# Altium PCB PCBPanier.PcbDoc
Units mm, origin at the board's own origin, x right, y up, seen from the top; angles counter-clockwise.
Board outline 80 x 100 mm, 2 copper layers (Top Layer, Bottom Layer); 52 components, 47 nets, 180 pads, 0 vias.
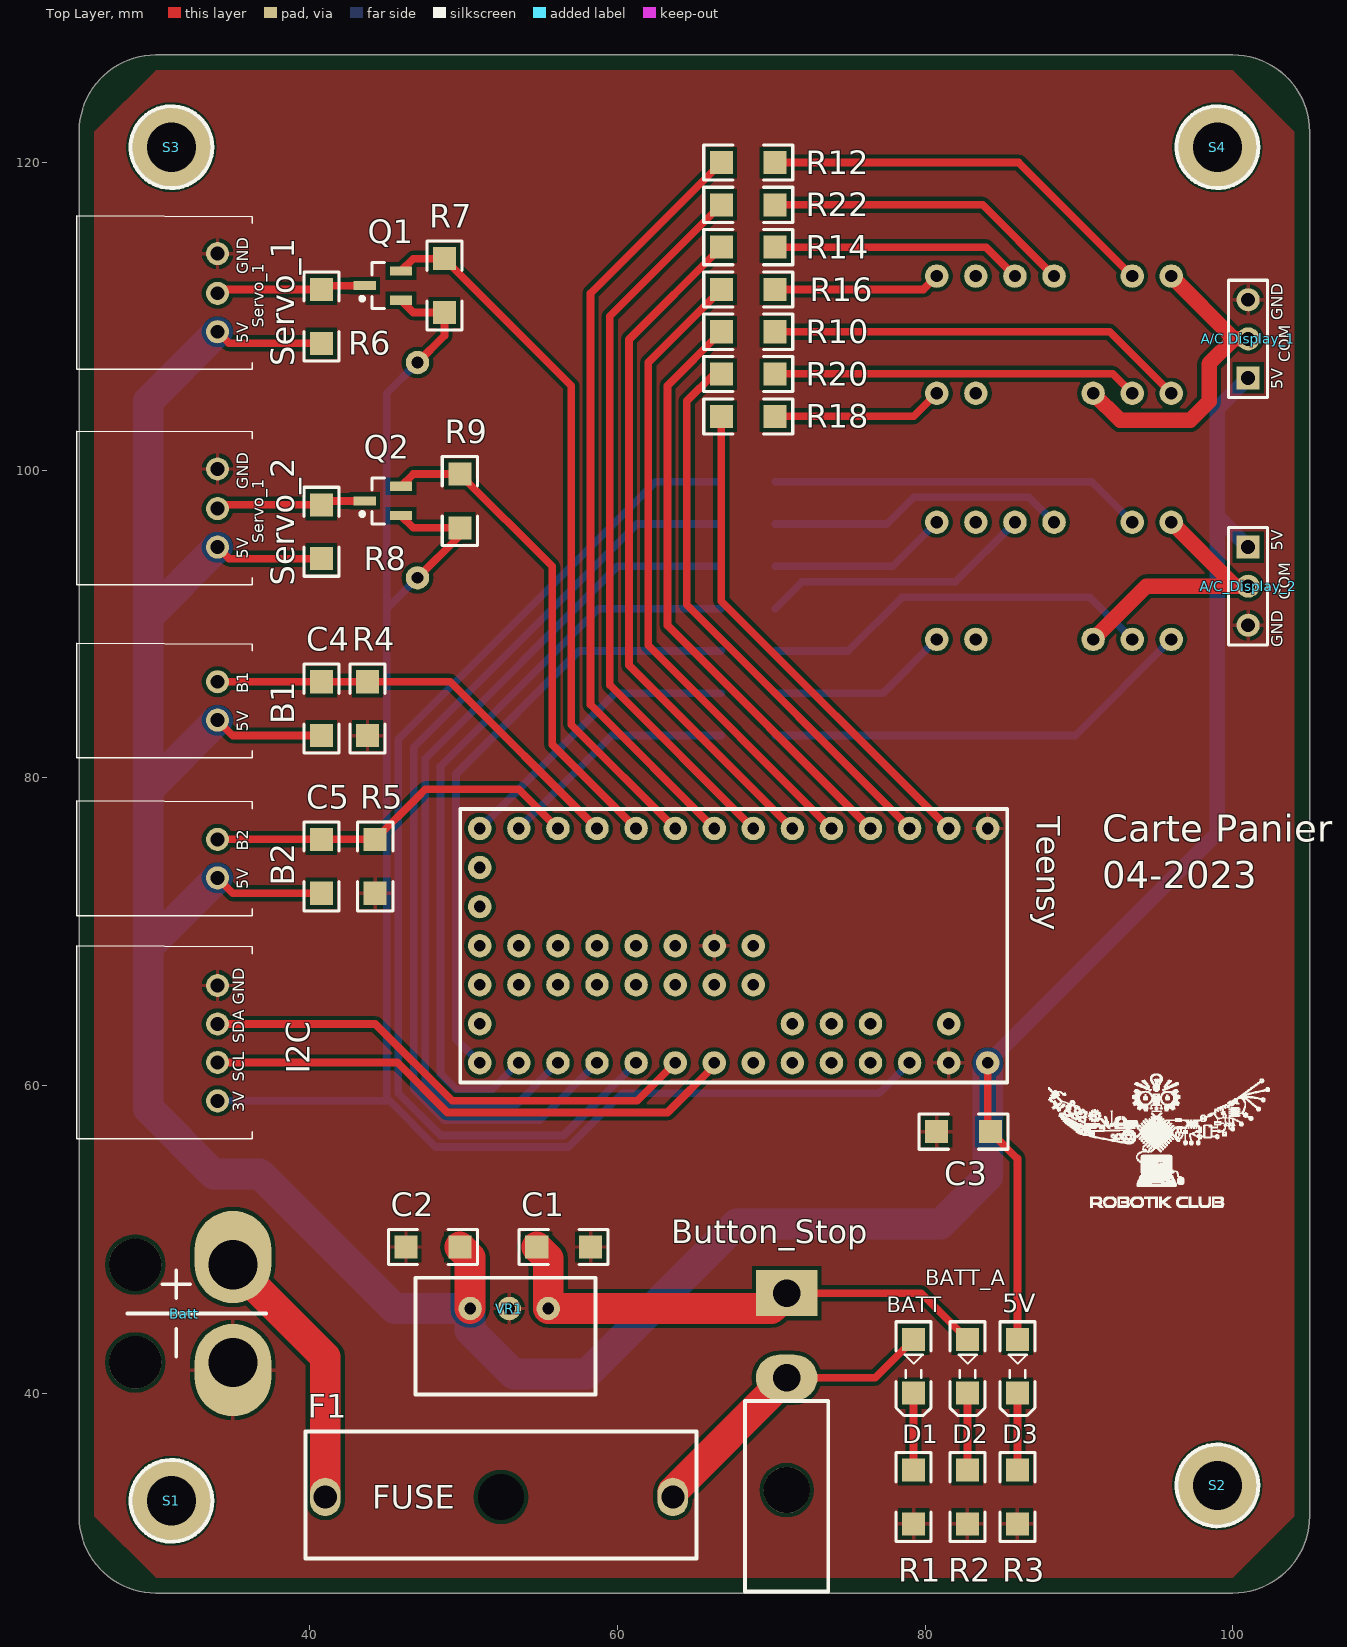
[diagram p0: Top Layer view]
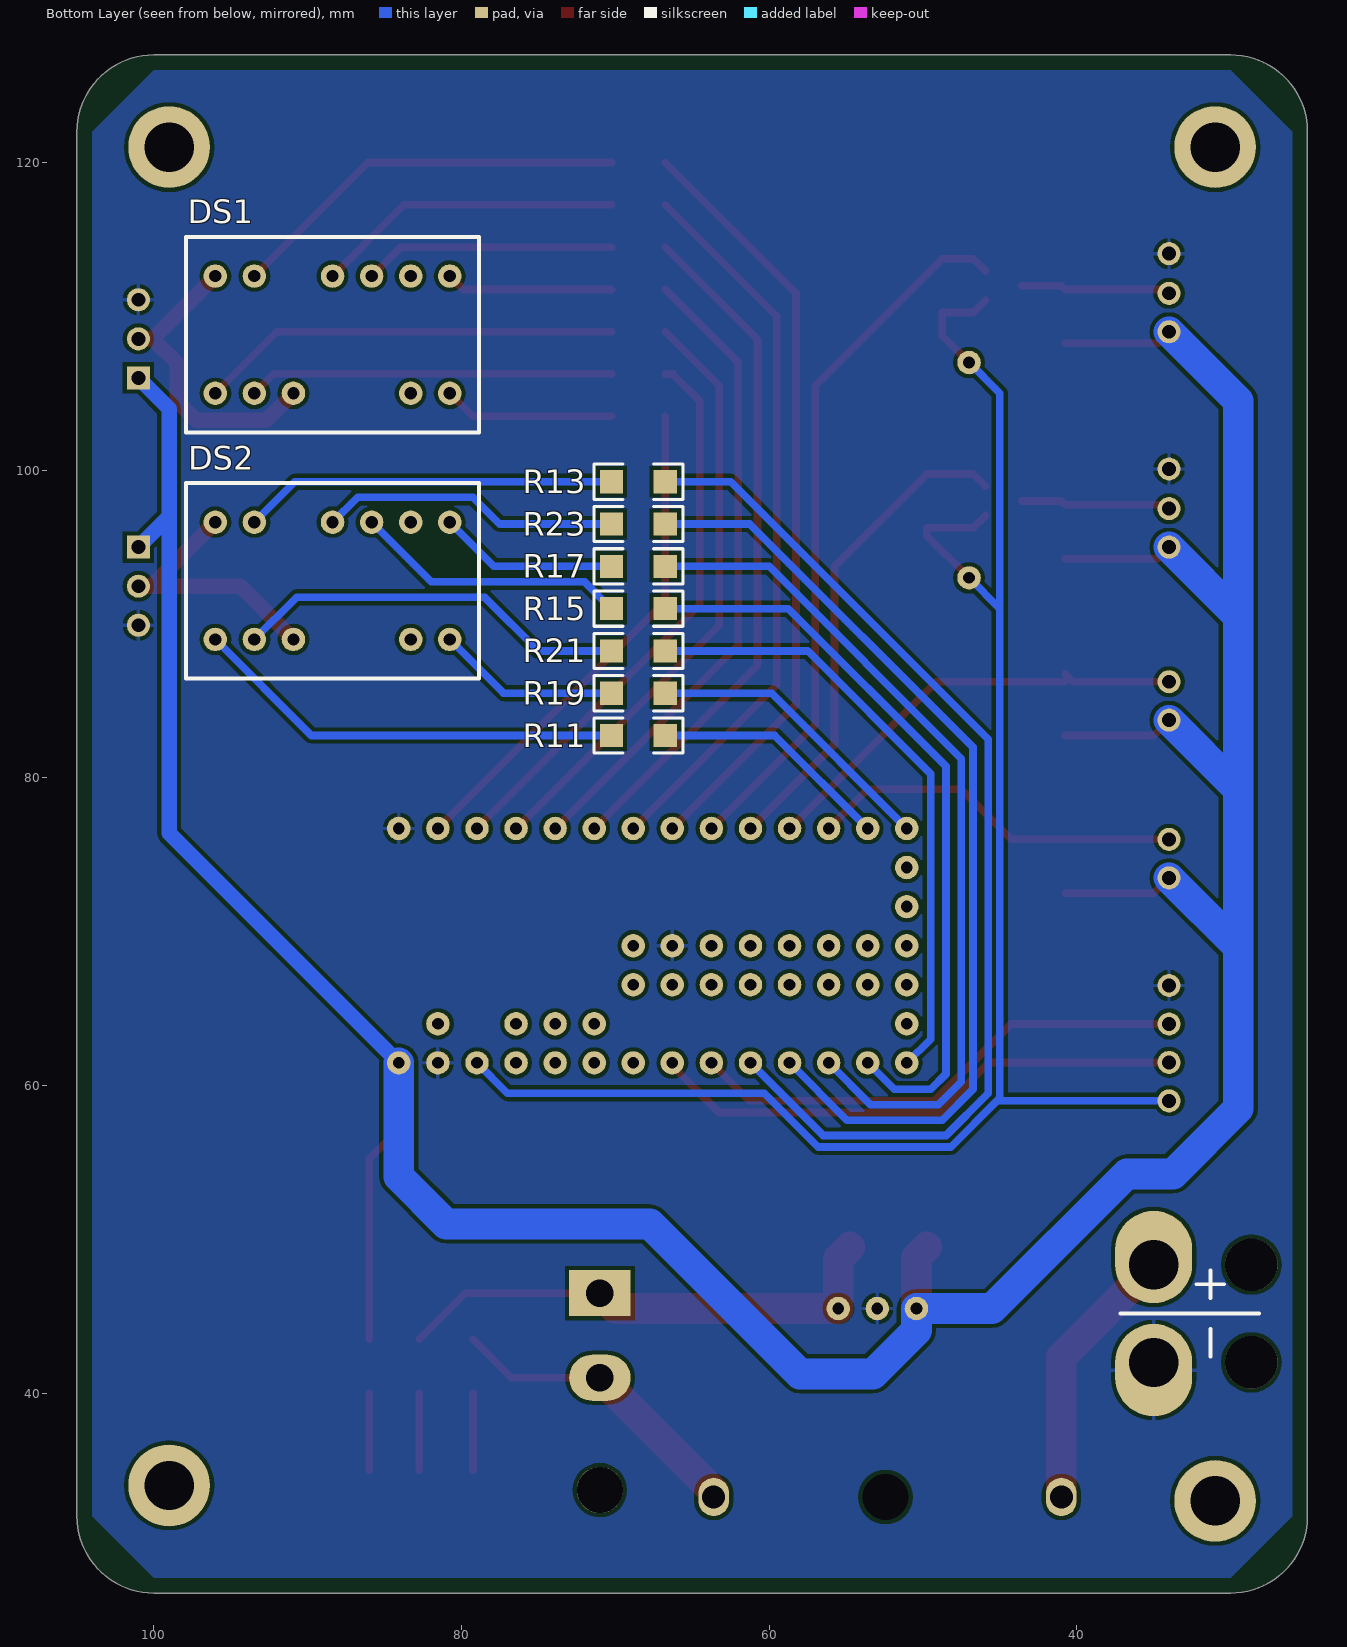
[diagram p1: Bottom Layer view, seen from below]

## Layer stack, top to bottom
Top Solder: solder mask 0.0102, Solder Resist, Dk 3.5
Top Layer: signal copper 0.0356
Dielectric 1: dielectric 0.32, FR-4, Dk 4.8
Bottom Layer: signal copper 0.0356
Bottom Solder: solder mask 0.0102, Solder Resist, Dk 3.5

## Board outline
25,32 25,122 cw(c30,122) 30,127 100,127 cw(c100,122) 105,122 105,32 cw(c100,32) 100,27 30,27 cw(c30,32)

## Design rules (kind name [scope] priority, off if disabled: settings)
Clearance [All] p1: gap=0.254
PolygonConnect [All] p1: connectstyle=Relief reliefconductorwidth=0.254 reliefentries=4 polygonreliefangle="90 Angle" airgapwidth=0.254
RoutingVias [All] p1: holewidth=0.711 width=1.27 viastyle="Through Hole" minholewidth=0.711 minwidth=1.27 maxholewidth=0.711 maxwidth=1.27
SolderMaskExpansion [All] p1: expansion=0.102
Width [All] p1: maxlimit=2 minlimit=0.254 preferedwidth=0.5
30 further rules are at their usual default settings.

## Components (designator, comment, footprint, x,y, rotation, side; value= is the part's Value field where it differs from the comment)
"A/C Display_1" "Common_7-segments" HDR1X3 101,106 r90 top
A/C_Display_2 "Common_7-segments" HDR1X3 101,95 r270 top
B1 "JST XH 2" S2B-XH-A 34,83.75 r90 top
B2 "JST XH 2" S2B-XH-A 34,73.5 r90 top
Batt "" "Battery SALE" 35,42 r90 top
Button_Stop "Header 2" Molex_MiniFitJr_2x1H 71,41 r270 top
C1 "Cap" "Capacitor 1206" 56.5,49.5 r180 top
C2 "Cap" "Capacitor 1206" 48,49.5 r0 top
C3 "(Optinal)" "Capacitor 1206" 82.5,57 r0 top
C4 "Cap" "Capacitor 1206" 40.75,84.5 r270 top
C5 "Cap" "Capacitor 1206" 40.75,74.25 r270 top
D1 "LED2" KP-3216SEC 79.25,41.75 r270 top
D2 "LED2" KP-3216SEC 82.75,41.75 r270 top
D3 "LED2" KP-3216SEC 86,41.75 r270 top
DS1 "Dpy Red-CA" "7 segments 5082-7731" 96,105 r90 bottom
DS2 "Dpy Red-CA" "7 segments 5082-7731" 96,89 r90 bottom
F1 "5A" Fuse 41,33.25 r0 top
I2C "Header 4H" S4B-XH-A 34,59 r90 top
Q1 "MOSFET-N" SOT23_M 44.75,112 r180 top
Q2 "MOSFET-N" SOT23_M 44.75,98 r180 top
R1 "" "Resistor 1206" 79.25,33.25 r90 top
R2 "" "Resistor 1206" 82.75,33.25 r90 top
R3 "" "Resistor 1206" 86,33.25 r90 top
R4 "Res2" "Resistor 1206" 43.75,84.5 r270 top
R5 "Res2" "Resistor 1206" 44.25,74.25 r270 top
R6 "" "Resistor 1206" 40.75,110 r270 top
R7 "" "Resistor 1206" 48.75,112 r270 top
R8 "" "Resistor 1206" 40.75,96 r270 top
R9 "" "Resistor 1206" 49.75,98 r270 top
R10 "Res2" "Resistor 1206" 68.5,109 r0 top
R11 "Res2" "Resistor 1206" 68.5,82.75 r0 bottom
R12 "Res2" "Resistor 1206" 68.5,120 r0 top
R13 "Res2" "Resistor 1206" 68.5,99.25 r0 bottom
R14 "Res2" "Resistor 1206" 68.5,114.5 r0 top
R15 "Res2" "Resistor 1206" 68.5,91 r0 bottom
R16 "Res2" "Resistor 1206" 68.5,111.75 r0 top
R17 "Res2" "Resistor 1206" 68.5,93.75 r0 bottom
R18 "Res2" "Resistor 1206" 68.5,103.5 r0 top
R19 "Res2" "Resistor 1206" 68.5,85.5 r0 bottom
R20 "Res2" "Resistor 1206" 68.5,106.25 r0 top
R21 "Res2" "Resistor 1206" 68.5,88.25 r0 bottom
R22 "Res2" "Resistor 1206" 68.5,117.25 r0 top
R23 "Res2" "Resistor 1206" 68.5,96.5 r0 bottom
S1 "Screw M3" "Screw M3" 31,33 r0 top
S2 "Screw M3" "Screw M3" 99,34 r0 top
S3 "Screw M3" "Screw M3" 31,121 r0 top
S4 "Screw M3" "Screw M3" 99,121 r0 top
Servo_1 "S3B-XH-A" S3B-XH-A 34,109 r90 top
Servo_2 "S3B-XH-A" S3B-XH-A 34,95 r90 top
Teensy "Teensy 3.2" teensy 63.75,79.25 r270 top
VR1 "TSR 2-2450" TRS 55.5,45.5 r0 top
? "" Logo_lowres 95,57 r0 top

## Footprints (in the part's own frame and the unit in brackets; to place one, negate y for a bottom-side part, rotate by r counter-clockwise, add the part's x,y. Pads: shape width x height; smd on the part's side, far side on the other; paste and mask are expansions set on the pad)
"7 segments 5082-7731" [mil] "pour Dpy Red-CA"
  round 60 hole 31.5: 1(0,-200) 2(0,-100) 3(300,-300) 4(0,-600) 5(300,-600) 6(300,0) 7(0,-500) 8(300,-400) 9(300,-100) 10(0,0) 14(300,-500)
  silkscreen extent -100,-675 400,75, body extent -100,-675 400,75, height 315
"Battery SALE" [mm] "Connecteur Batterie"
  round 3.4 hole 3.4: 0(0,6.35) 0(6.35,6.35)
  oval 6x5 hole 3.2 copper offset -0.5,0: 1(0,0)
  oval 6x5 hole 3.2 copper offset 0.5,0: 2(6.35,0)
  silkscreen extent 0.38,-2.16 5.97,6.86
"Capacitor 1206" [mm]
  rect 1.5x1.5 smd: 1(-1.75,0) 2(1.75,0)
  silkscreen extent -2.89,-1.14 2.89,1.14, body extent -1.98,-0.99 1.98,0.96, height 1.3
Fuse [mm] "Porte-fusible monté sur circuit 10 (UL) A, 6.3 (VDE) A, fusible Cartouche, 893-0574"
  round 2 hole 3: 0(11.43,0)
  oval 2x2.5 hole 1.5: 1(0,0) 2(22.6,0)
  silkscreen extent -1.27,-4 24.13,4.25, body extent -1.27,-4.29 24.13,4.29, height 11.41
HDR1X3 [mm] "Connector; Header; 3 Position"
  rect 1.5x1.5 hole 0.9: 1(0,0)
  round 1.5 hole 0.9: 2(2.54,0) 3(5.08,0)
  silkscreen extent -1.27,-1.27 6.35,1.27
KP-3216SEC [mm]
  rect 1.5x1.5 smd: 1(-1.75,0) 2(1.75,0)
  silkscreen extent -2.89,-1.14 3.2,1.14, body extent -1.7,-0.79 1.5,0.81, height 1.1
Logo_lowres [mm]
  silkscreen extent -7.01,-4.93 7.39,3.76
Molex_MiniFitJr_2x1H [mm] "Connecteur Molex 2"
  rect 3x4 hole 1.8: 1(-5.5,0)
  oval 3x4 hole 1.8: 2(0,0)
  round 3 hole 3 unplated: 3(7.3,0)
  silkscreen extent 1.5,-2.7 13.9,2.7, body extent -6.03,-2.7 13.9,3.1, height 11.01
"Resistor 1206" [mm]
  rect 1.5x1.5 smd: 1(-1.75,0) 2(1.75,0)
  silkscreen extent -2.89,-1.14 2.89,1.14, body extent -1.98,-0.95 1.98,0.93, height 0.55
S2B-XH-A [mm]
  round 1.5 hole 0.9: 1(0,0) 2(2.5,0)
  silkscreen extent -2.45,-2.26 5,9.14, body extent -2.41,-2.32 4.99,9.18, height 6.15
S3B-XH-A [mm]
  round 1.5 hole 0.9: 1(0,0) 2(2.5,0) 3(5.08,0)
  silkscreen extent -2.45,-2.26 7.54,9.14, body extent -2.44,-2.27 7.46,9.23, height 6.15
S4B-XH-A [mm]
  round 1.5 hole 0.9: 1(0,0) 2(2.5,0) 3(5,0) 4(7.5,0)
  silkscreen extent -2.45,-2.26 10.08,9.14, body extent -2.44,-2.32 9.96,9.18, height 6.15
"Screw M3" [mm] "M3 iso Screw"
  round 5.32 hole 3.2 unplated: 0(0,0)
  silkscreen extent -2.66,-2.66 2.66,2.66
SOT23_M [mm] "SOT23, 3-Leads, Body 2.9x1.3mm, Pitch 0.95mm, Lead Span 2.3mm - Reverse Pinning, IPC Low Density"
  rect 1.45x0.6 smd: 1(1.175,0) 2(-1.175,-0.95) 3(-1.175,0.95)
  silkscreen extent -0.1,-1.5 1.47,1.5, body extent -0.7,-1.5 0.7,1.5, height 1.1
teensy [mil] "Teensy 3.2"
  round 60 hole 30: 0(100,700) 1(100,600) 2(100,500) 3(100,400) 4(100,300) 5(100,200) 6(100,100) 7(100,0) 8(100,-100) 9(100,-200) 10(100,-300) 11(100,-400) 12(100,-500) 13(700,-500) 14(700,-400) 15(700,-300) 16(700,-200) 17(700,-100) 18(700,0) 19(700,100) 20(700,200) 21(700,300) 22(700,400) 23(700,500) 24(400,0) 25(400,-100) 26(400,-200) 27(400,-300) 28(400,-400) 29(500,-400) 30(500,-300) 31(500,-200) 32(500,-100) 33(500,0) 34(600,400) 35(600,300) 36(400,200) 37(500,200) 38(600,500) 39(500,100) 40(400,100) 41(700,600) 42(700,700) 43(700,800) 44(100,800) 45(600,-500) 46(500,-500) 47(400,-500) 48(300,-500) 49(200,-500) 50(600,700)
  silkscreen extent 50,-550 750,850, body extent 48,-550 752,907, height 505
TRS [mil]
  round 60 hole 30: 1(0,0) 2(-100,0) 3(-200,0)
  silkscreen extent -340,-220 121,79, body extent -341,-218 120,80, height 398

## Part data
"A/C Display_1" A/C_Display_2: library part "Header 3", "Header, 3-Pin"
B1 B2 Batt: library part "Header 2", "Header, 2-Pin"
Button_Stop: "Header, 2-Pin"
C1 C2 C4 C5: "Capacitor"
C3: library part Cap, "Capacitor"
D1 D2 D3: "Typical RED, GREEN, YELLOW, AMBER GaAs LED"
DS1 DS2: "7.62 mm Black Surface HER 7-Segment Display: CA, RH DP"
F1: library part "Fuse 2", "Fuse"
I2C: "Header, 4-Pin, Right Angle"
Q1 Q2: "N-Channel MOSFET"
R1 R2 R3 R6 R7 R8 R9: library part Res2, "Resistor"
R4 R5 R10 R11 R12 R13 R14 R15 R16 R17 R18 R19 R20 R21 R22 R23: "Resistor"
Servo_1 Servo_2: library part "Header 3H", "Header, 3-Pin, Right Angle"
Teensy: library part teensy3.2
VR1: library part "Volt Reg", "Voltage Regulator"

## Free pads (board coordinates)
  round 1.524 hole 0.762: 2(47,93) 2(47,107)

## Nets (pads, with @x,y where several pads share a name; then routed paths per layer and width w, separated by ;. In a path a pad name is that pad's centre, name@x,y a point inside that pad or via, vN(x,y) a via of type N, cw(c..) or ccw(c..) an arc to the next point about the centre after c; other vN are vias at no path point)
3V: I2C.1 pad.2 Q1.3 Q2.3 R7.2 R9.2 Teensy.41 | length 115.9
  Top Layer w0.5: Q2.3 46.725,96.25 R9.2 49.75,95.75 pad.2@47,93 ; Q1.3 46.725,110.25 R7.2 48.75,108.75 pad.2@47,107
  Bottom Layer w0.5: I2C.1 45.184,59 ; 44.996,90.996 pad.2@47,93 ; pad.2@47,107 45,105 45,104 44.996,103.996 44.996,59.188 45.184,59 ; Teensy.41 77.02,59.5 60.306,59.5 56.802,55.996 48.188,55.996 45.184,59
5V: "A/C Display_1.1" A/C_Display_2.1 B1.1 B2.1 C2.2 C3.2 C4.2 C5.2 D3.1 R6.2 R8.2 Servo_1.1 Servo_2.1 Teensy.43 VR1.3 | length 252.6
  Top Layer w0.5: B2.1 35,72.5 C5.2 ; B1.1 35,82.75 C4.2 ; Servo_2.1 34.75,94.25 R8.2 ; Servo_1.1 34.75,108.25 R6.2 ; Teensy.43 84.07,57.18 C3.2 86,55.25 D3.1
  Top Layer w2: C2.2 50.42,48.83 VR1.3
  Bottom Layer w1: Teensy.43 99,76.4 99,97 ; A/C_Display_2.1 99,97 ; 101,106 99,104 99,97
  Bottom Layer w2: B2.1 29.5,69 ; B1.1 29.5,79.25 ; Servo_2.1 29.5,90.5 ; Servo_1.1 29.5,104.5 29.5,90.5 ; Teensy.43 84.07,54.07 81,51 67.75,51 58,41.25 53.25,41.25 50.42,44.08 VR1.3 45.5,45.5 36.75,54.25 33.75,54.25 29.5,58.5 29.5,69 ; 29.5,69 29.5,79.25 ; 29.5,79.25 29.5,90.5
A1: DS1.10 R10.2 | length 27.4
  Top Layer w0.5: R10.2 92,109 DS1.10
A2: DS2.10 R11.2 | length 28.3
  Bottom Layer w0.5: R11.2 89.75,82.75 DS2.10
ANODE-CATHODE-COM_1: "A/C Display_1.2" DS1.1 DS1.6 | length 20.2
  Top Layer w1: DS1.1 92.67,103.25 97.25,103.25 98.467,104.467 98.467,106.927 100.08,108.54 ; DS1.6 100.08,108.54 ; 101,108.54 100.08,108.54
ANODE-CATHODE-COM_2: A/C_Display_2.2 DS2.1 DS2.6 | length 17.4
  Top Layer w1: DS2.1 94.38,92.46 100.16,92.46 ; DS2.6 100.16,92.46 ; A/C_Display_2.2 100.16,92.46
B1: DS1.9 R12.2 | length 26.3
  Top Layer w0.5: R12.2 86.08,120 DS1.9
B2: DS2.9 R13.2 | length 24.3
  Bottom Layer w0.5: R13.2 90.83,99.25 DS2.9
C1: DS1.8 R14.2 | length 16.4
  Top Layer w0.5: R14.2 83.96,114.5 DS1.8
C2: DS2.8 R15.2 | length 17.9
  Bottom Layer w0.5: R15.2 72,92.75 81.97,92.75 DS2.8
D1: DS1.5 R16.2 | length 10.9
  Top Layer w0.5: R16.2 79.89,111.75 DS1.5
D2: DS2.5 R17.2 | length 11.7
  Bottom Layer w0.5: R17.2 77.89,93.75 DS2.5
DISPLAY_A_1: R10.1 Teensy.2 | length 39.2
  Top Layer w0.5: R10.1 63.25,105.5 63.25,89.91 Teensy.2
DISPLAY_A_2: R11.1 Teensy.11 | length 15.7
  Bottom Layer w0.5: Teensy.11 59.63,82.75 R11.1
DISPLAY_B_1: R12.1 Teensy.6 | length 50.1
  Top Layer w0.5: Teensy.6 58.25,84.75 58.25,111.5 R12.1
DISPLAY_B_2: R13.1 Teensy.17 | length 69.5
  Bottom Layer w0.5: Teensy.17 56.49,56.75 48.5,56.75 45.75,59.5 45.75,82.5 62.5,99.25 R13.1
DISPLAY_C_1: R14.1 Teensy.4 | length 44.7
  Top Layer w0.5: R14.1 60.75,108.5 60.75,87.33 Teensy.4
DISPLAY_C_2: R15.1 Teensy.14 | length 48.7
  Bottom Layer w0.5: Teensy.14 51.87,59.75 49.5,59.75 48.5,60.75 48.5,80.75 58.75,91 R15.1
DISPLAY_D_1: R16.1 Teensy.3 | length 41.9
  Top Layer w0.5: R16.1 62,107 62,88.62 Teensy.3
DISPLAY_D_2: R17.1 Teensy.15 | length 55.8
  Bottom Layer w0.5: Teensy.15 53.41,58.75 49,58.75 47.5,60.25 47.5,81.25 60,93.75 R17.1
DISPLAY_E_1: R18.1 Teensy.0 | length 32.9
  Top Layer w0.5: R18.1 66.75,91.49 Teensy.0
DISPLAY_E_2: R19.1 Teensy.12 | length 19.3
  Bottom Layer w0.5: Teensy.12 59.84,85.5 R19.1
DISPLAY_F_1: R20.1 Teensy.1 | length 36.8
  Top Layer w0.5: R20.1 66.25,106.25 64.5,104.5 64.5,91.25 Teensy.1@79.015,76.735
DISPLAY_F_2: R21.1 Teensy.13 | length 40
  Bottom Layer w0.5: Teensy.13 49.5,63.02 49.5,80.25 57.5,88.25 R21.1
DISPLAY_G_1: R22.1 Teensy.5 | length 47.4
  Top Layer w0.5: R22.1 59.5,110 59.5,86.04 Teensy.5
DISPLAY_G_2: R23.1 Teensy.16 | length 62.5
  Bottom Layer w0.5: Teensy.16 54.95,57.75 48.75,57.75 46.746,59.754 46.746,81.996 61.25,96.5 R23.1
E1: DS1.4 R18.2 | length 11.1
  Top Layer w0.5: R18.2 79.26,103.5 DS1.4
E2: DS2.4 R19.2 | length 12
  Bottom Layer w0.5: R19.2 77.26,85.5 DS2.4
F1: DS1.2 R20.2 | length 23.8
  Top Layer w0.5: R20.2 70.25,106.266 92.194,106.266 DS1.2
F2: DS2.2 R21.2 | length 25.8
  Bottom Layer w0.5: R21.2 75,88.25 78.5,91.75 90.71,91.75 DS2.2
G1: DS1.3 R22.2 | length 20
  Top Layer w0.5: R22.2 83.75,117.25 DS1.3
G2: DS2.3 R23.2 | length 19.5
  Bottom Layer w0.5: R23.2 77.504,96.5 79.254,98.25 86.75,98.25 DS2.3
GND: "A/C Display_1.3" A/C_Display_2.3 Batt.1 C1.1 C2.1 C3.1 I2C.4 R1.1 R2.1 R3.1 R4.2 R5.2 Servo_1.3 Servo_2.3 Teensy.40 Teensy.42 Teensy.44 VR1.2
I2C_SCL: I2C.2 Teensy.19 | length 34.9
  Top Layer w0.5: I2C.2 45.684,61.5 48.938,58.246 63.254,58.246 Teensy.19@66.29,61.282
I2C_SDA: I2C.3 Teensy.18 | length 32.8
  Top Layer w0.5: I2C.3 44.25,64 49.25,59 61.28,59 Teensy.18
NetBatt_2: Batt.2 F1.1 | length 17.6
  Top Layer w2: Batt.2 41,42.35 F1.1
NetD1_2: D1.2 R1.2 | length 5
  Top Layer w0.5: R1.2 D1.2
NetD2_2: D2.2 R2.2 | length 5
  Top Layer w0.5: R2.2 D2.2
NetD3_2: D3.2 R3.2 | length 5
  Top Layer w0.5: R3.2 D3.2
SERVO_1: Q1.1 R6.1 Servo_1.2 | length 9.8
  Top Layer w0.5: Servo_1.2 34.25,111.75 R6.1 41,112 Q1.1
SERVO_2: Q2.1 R8.1 Servo_2.2 | length 9.8
  Top Layer w0.5: Servo_2.2 34.25,97.75 R8.1 41,98 Q2.1
T_BUMP_1: B1.2 C4.1 R4.1 Teensy.9 | length 28.8
  Top Layer w0.5: B1.2 40.25,86.25 C4.1@40.75,86.75 ; C4.1 49.13,86.25 Teensy.9
T_BUMP_2: B2.2 C5.1 R5.1 Teensy.10 | length 24.5
  Top Layer w0.5: B2.2 37.75,76 C5.1 R5.1 47,78.75 47.5,79.25 53.59,79.25 Teensy.10
T_SERVO_1: Q1.2 R7.1 Teensy.7 | length 46.4
  Top Layer w0.5: Q1.2 46.725,113.75 R7.1 57,105.5 57,83.46 Teensy.7
T_SERVO_2: Q2.2 R9.1 Teensy.8 | length 31.9
  Top Layer w0.5: Q2.2 46.725,99.75 R9.1 55.75,93.75 55.75,82.17 Teensy.8
V_BATT: Button_Stop.2 D1.1 F1.2 | length 20.1
  Top Layer w0.5: Button_Stop.2 76.75,41 D1.1
  Top Layer w2: F1.2 63.6,33.6 Button_Stop.2
V_BATT_A: Button_Stop.1 C1.2 D2.1 VR1.1 | length 33.2
  Top Layer w0.5: Button_Stop.1 79.75,46.5 D2.1
  Top Layer w2: C1.2 55.5,48.75 VR1.1 70,45.5 Button_Stop.1
pads on no net: Batt.0 Button_Stop.3 DS1.7 DS1.14 DS2.7 DS2.14 F1.0 S1.0 S2.0 S3.0 S4.0 Teensy.20 Teensy.21 Teensy.22 Teensy.23 Teensy.24 Teensy.25 Teensy.26 Teensy.27 Teensy.28 Teensy.29 Teensy.30 Teensy.31 Teensy.32 Teensy.33 Teensy.34 Teensy.35 Teensy.36 Teensy.37 Teensy.38 Teensy.39 Teensy.45 Teensy.46 Teensy.47 Teensy.48 Teensy.49 Teensy.50

## Polygon pours and split planes (outlines as drawn)
GND on Top Layer "GND-Top" (solid, remove dead copper, pour order 2): 30,28 26,32 26,122 30,126 100,126 104,122 104,32 100,28 30,28
GND on Bottom Layer "GND-Bot" (solid, remove dead copper, pour order 4): 30,126 100,126 104,122 104,32 100,28 30,28 26,32 26,122 30,126

## Silkscreen, mask and mechanical layers (free items; w line width, h text height)
Top Overlay:
  text "GND" at 36.25,112.75 h1.3 r90
  text "GND" at 103.5,109.75 h1.3 r90
  text "Servo_1" at 37.25,109.25 h1.3 r90
  text "5V" at 36.25,108.25 h1.3 r90
  text "COM" at 104,107.004 h1.3 r90
  text "5V" at 103.5,105.25 h1.3 r90
  text "GND" at 36.25,98.75 h1.3 r90
  text "Servo_1" at 37.25,95.25 h1.3 r90
  text "5V" at 103.5,94.75 h1.3 r90
  text "5V" at 36.25,94.25 h1.3 r90
  text "COM" at 104,91.583 h1.3 r90
  text "GND" at 103.5,88.5 h1.3 r90
  text "B1" at 36.25,85.5 h1.3 r90
  text "5V" at 36.25,83 h1.3 r90
  text "B2" at 36.25,75.25 h1.3 r90
  text "5V" at 36.25,72.75 h1.3 r90
  text "Carte Panier V1 / 04-2023" at 91.5,72.25 h3
  text "GND" at 36,65.25 h1.3 r90
  text "SDA" at 36,62.75 h1.3 r90
  text "SCL" at 36,60.25 h1.3 r90
  text "3V" at 36,58.25 h1.3 r90
  text "BATT_A" at 80,47 h1
  text "BATT" at 77.5,45.25 h1
  text "5V" at 85,45.25 h1.2
Mechanical 13:
  the board outline again, w0.254

## Text inside footprints (layer, text, board x,y; h text height)
F1: Top Overlay "FUSE" at 44.048,32.488 h1.52